# Altium PCB PCB1.PcbDoc
Units mil, origin at the board's own origin, x right, y up, seen from the top; angles counter-clockwise.
Board outline 6000 x 4000 mil, 3 copper layers (Top Layer, Mid-Layer 1, Bottom Layer); 10 components, 18 nets, 85 pads, 10 vias.
Unrouted connection lines stored in the file: 1.
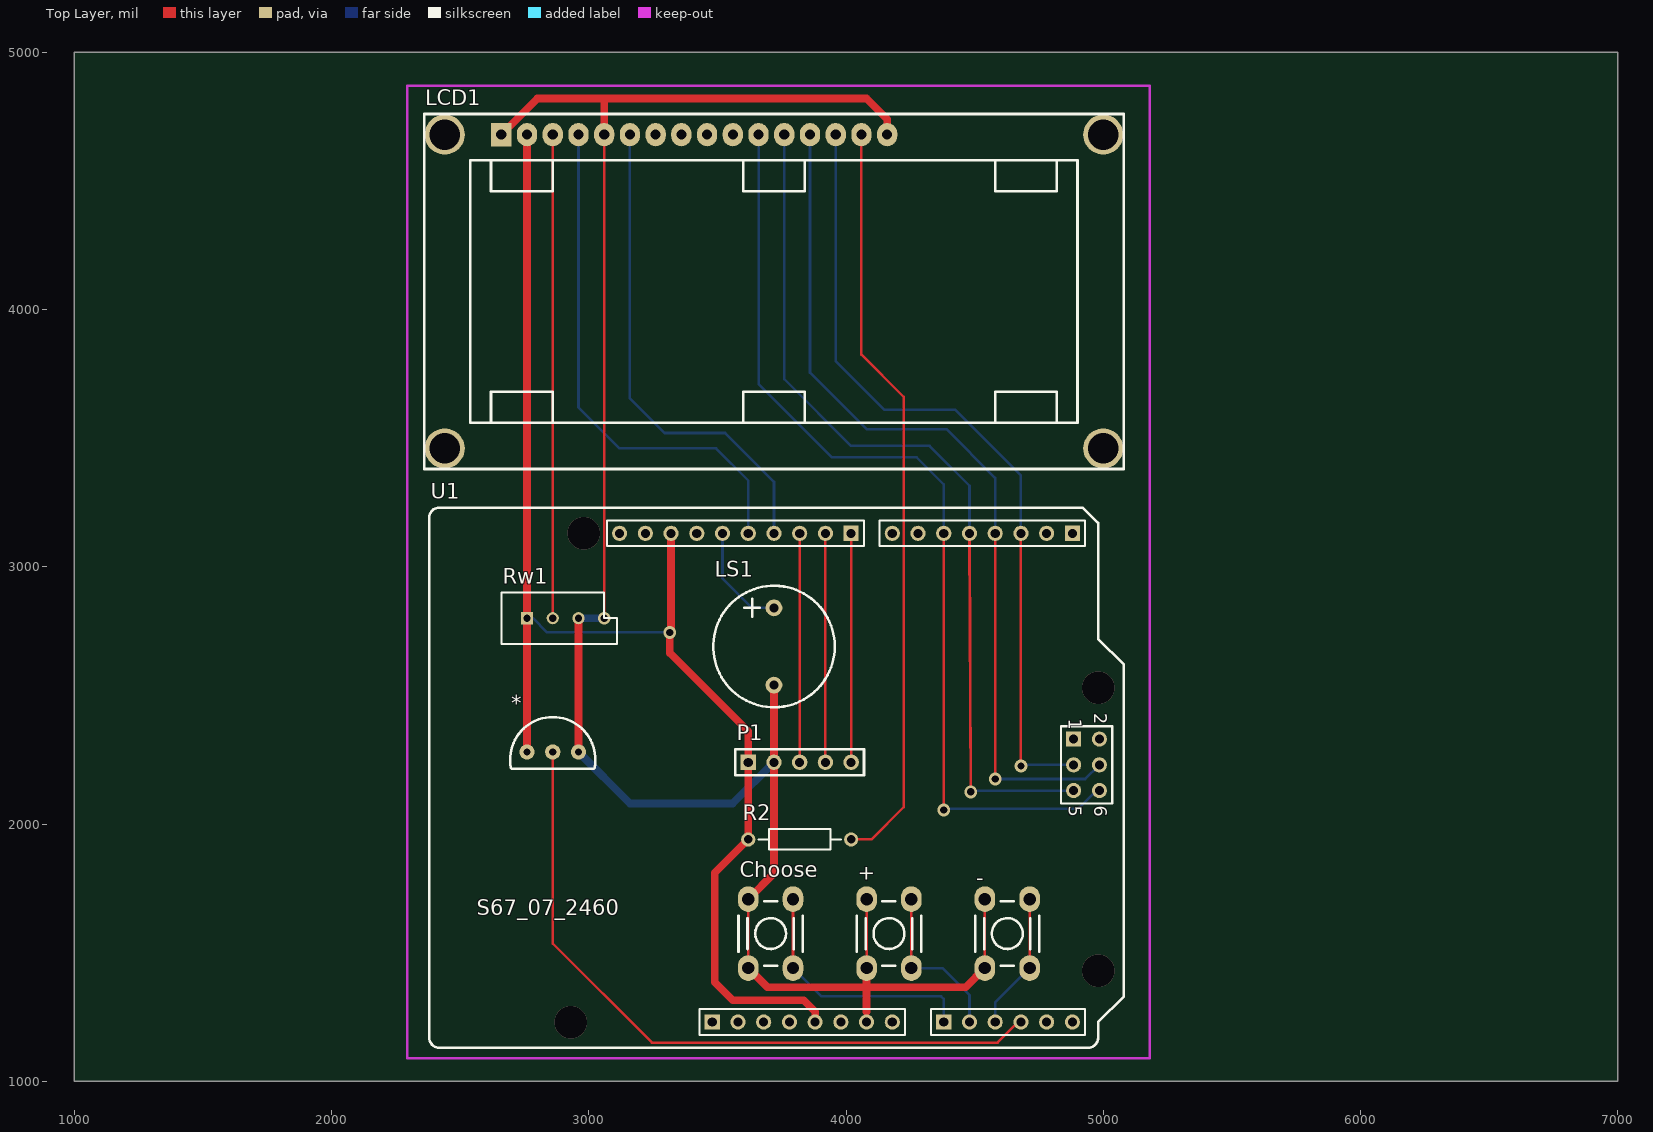
[diagram p0: Top Layer view]
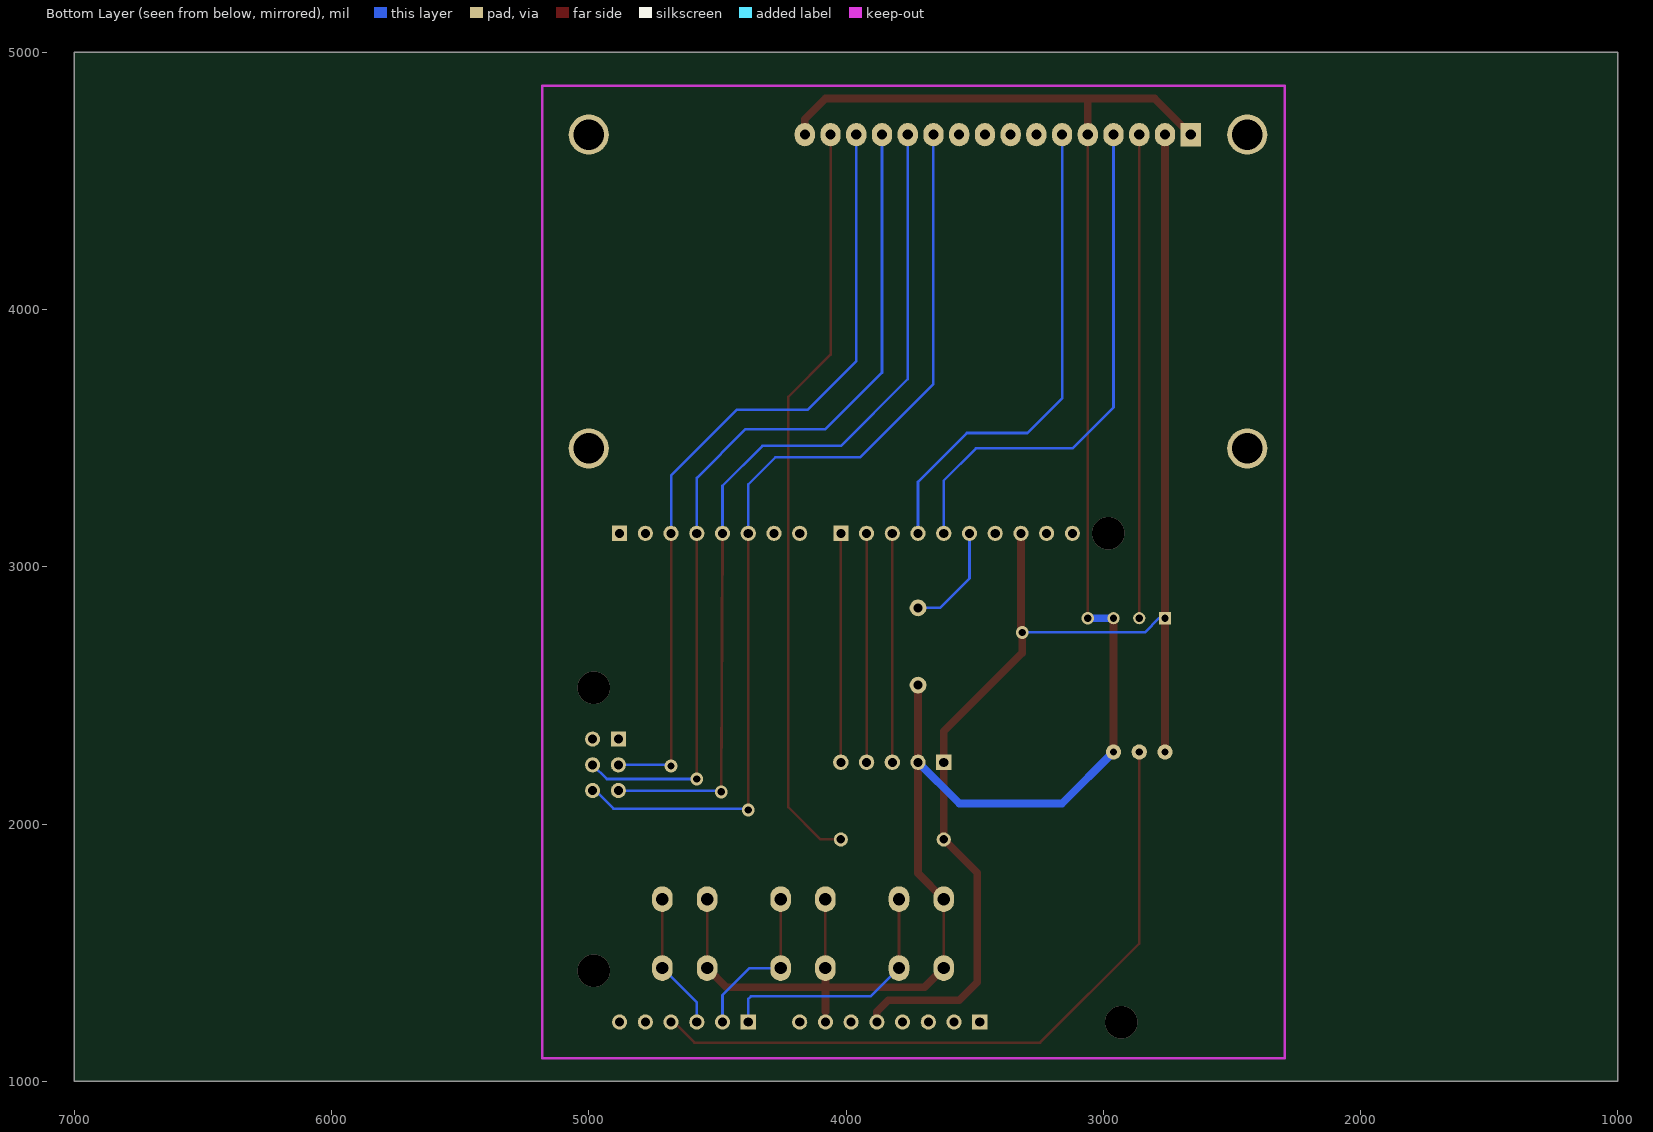
[diagram p1: Bottom Layer view, seen from below]

## Layer stack, top to bottom
Top Layer: signal copper 1.4
Dielectric: dielectric 12.6, FR-4, Dk 4.8
Mid-Layer 1: signal copper 1.4
Dielectric: dielectric 12.6, FR-4, Dk 4.8
Bottom Layer: signal copper 1.4

## Board outline
1000,1000 7000,1000 7000,5000 1000,5000

## Design rules (kind name [scope] priority, off if disabled: settings)
Clearance [All] p1: gap=10
PolygonConnect [All] p1: connectstyle=Relief reliefconductorwidth=10 reliefentries=4 polygonreliefangle="90 Angle"
RoutingVias [All] p1: holewidth=28 width=50 viastyle="Through Hole" minholewidth=28 minwidth=50 maxholewidth=28 maxwidth=50
SilkscreenOverComponentPads [All] p1 off: minsilkscreentomaskgap=10
SolderMaskExpansion [All] p1: expansion=4
TestPointUsage [All] p1: valid=0 allowmultiple=FALSE
Testpoint [All] p1: side=15 testpointundercomponent=TRUE minsize=40 maxsize=100 preferedsize=60 minholesize=0 maxholesize=40 preferedholesize=32 testpointgrid=1 style=1023 order=0123456789
Width [All] p1: maxlimit=30 minlimit=10 preferedwidth=10 midlayer1_maxwidth=10 minimp=50.000000 maximp=50.000000 favimp=50.000000
23 further rules are at their usual default settings.

## Components (designator, comment, footprint, x,y, rotation, side; value= is the part's Value field where it differs from the comment)
* "LM35" LM35 2760,2280 r90 top
+ "SW-PB" AN-S 4080,1440 r90 top
- "SW-PB" AN-S 4540,1440 r90 top
Choose "SW-PB" AN-S 3620,1440 r90 top
LCD1 "LCD1602" LCD1602 2660,4680 r0 top
LS1 "Buzzer" Buzzer 3720,2840 r270 top
P1 "Header 5" SIP-5 3620,2240 r0 top
R2 "Res2" AXIAL-0.4 3820,1940 r0 top
Rw1 "RPot" VR5 2860,2800 r0 top
U1 "Arduino" Arduino-UNO 4020,2180 r0 top

## Footprints (in the part's own frame and the unit in brackets; to place one, negate y for a bottom-side part, rotate by r counter-clockwise, add the part's x,y. Pads: shape width x height; smd on the part's side, far side on the other; paste and mask are expansions set on the pad)
AN-S [mil] "小按钮开关"
  oval 100x80 hole 48: 1(0,0) 1(268,0) 2(0,-174) 2(268,-174)
  silkscreen extent 9,-212 259,38
Arduino-UNO [mm] "Arduino板"
  rect 1.5x1.5 hole 0.9: 1(21.844,24.13) 1(21.971,3.81) 9(0,24.13) 19(-13.716,-24.13) 27(9.144,-24.13)
  round 1.5 hole 0.9: 2(19.304,24.13) 2(24.511,3.81) 3(16.764,24.13) 3(21.971,1.27) 4(14.224,24.13) 4(24.511,1.27) 5(11.684,24.13) 5(21.971,-1.27) 6(9.144,24.13) 6(24.511,-1.27) 7(6.604,24.13) 8(4.064,24.13) 10(-2.54,24.13) 11(-5.08,24.13) 12(-7.62,24.13) 13(-10.16,24.13) 14(-12.7,24.13) 15(-15.24,24.13) 16(-17.78,24.13) 17(-20.32,24.13) 18(-22.86,24.13) 20(-11.176,-24.13) 21(-8.636,-24.13) 22(-6.096,-24.13) 23(-3.556,-24.13) 24(-1.016,-24.13) 25(1.524,-24.13) 26(4.064,-24.13) 28(11.684,-24.13) 29(14.224,-24.13) 30(16.764,-24.13) 31(19.304,-24.13) 32(21.844,-24.13)
  silkscreen extent -41.66,-26.67 26.92,26.67
AXIAL-0.4 [mm] "Resistor; 2 Leads"
  round 1.4 hole 0.85: 1(-5.08,0) 2(5.08,0)
  silkscreen extent -4.06,-1.02 4.06,1.02
Buzzer [mil] "蜂鸣器"
  round 65 hole 36: 1(0,0) 2(300,0)
  silkscreen extent -86,-236 386,236
LCD1602 [mm] "1602液晶屏"
  round 3.962 hole 3: 0(-5.588,-30.988) 0(-5.588,0) 0(59.436,-30.988) 0(59.436,0)
  rect 2x2.3 hole 1: 1(0,0)
  oval 2x2.3 hole 1: 2(2.54,0) 3(5.08,0) 4(7.62,0) 5(10.16,0) 6(12.7,0) 7(15.24,0) 8(17.78,0) 9(20.32,0) 10(22.86,0) 11(25.4,0) 12(27.94,0) 13(30.48,0) 14(33.02,0) 15(35.56,0) 16(38.1,0)
  silkscreen extent -7.62,-33.02 61.47,2.03
LM35 [mil]
  round 60 hole 28: 1(0,0) 2(0,-100) 3(0,-200)
  silkscreen extent -65,-266 136,66
SIP-5 [mil]
  rect 60x60 hole 35: 1(0,0)
  round 60 hole 35: 2(100,0) 3(200,0) 4(300,0) 5(400,0)
  silkscreen extent -50,-50 450,50
VR5 [mm] "Potentiometer; 3 Leads"
  rect 1.2x1.2 hole 0.7: 1(-2.54,0)
  round 1.2 hole 0.7: 2(0,0) 3(2.54,0)
  silkscreen extent -5.08,-2.54 6.35,2.54

## Part data
*: "LM35温度传感器"
+ - Choose: "微动开关"
LCD1: "液晶屏"
LS1: library part Bell, "Electrical Bell"
P1: "Header, 5-Pin"
R2: "Resistor"
Rw1: "Potentiometer"
U1: library part Arduino-UNO

## Via types
v1: diameter 50, hole 28, Top Layer to Bottom Layer, 6 vias
v2: diameter 125.98, hole 125.98, Top Layer to Bottom Layer, 4 vias

## Nets (pads, with @x,y where several pads share a name; then routed paths per layer and width w, separated by ;. In a path a pad name is that pad's centre, name@x,y a point inside that pad or via, vN(x,y) a via of type N, cw(c..) or ccw(c..) an arc to the next point about the centre after c; other vN are vias at no path point)
+5V: *.1 LCD1.2 P1.1 R2.1 Rw1.1 U1.16 U1.23 | length 5385.6
  Top Layer w30: *.1 Rw1.1 LCD1.2 ; v1(3315,2745) 3315,2665 3620,2360 P1.1 R2.1 3490,1810 3490,1385 3560.47,1314.53 3835.47,1314.53 3880,1270 U1.23 ; v1@3320,2740 U1.16
  Bottom Layer w10: Rw1.1 2782.76,2800 2837.76,2745 v1(3315,2745)
GND: *.3 +.1 -.1 Choose.1 LCD1.1 LCD1.5 LCD1.16 LS1.2 P1.2 Rw1.3 U1.24 U1.25 | length 8029.8
  Top Layer w10: v1(3060,2800) LCD1.5 ; Choose.1@3620,1440 Choose.1@3620,1708 ; +.1@4080,1440 +.1@4080,1708 ; -.1@4540,1440 -.1@4540,1708
  Top Layer w30: LCD1.1 2800,4820 4080,4820 4160,4740 LCD1.16 ; *.3 Rw1.3 ; LCD1.5 3060,4820 ; Choose.1@3620,1440 3695,1365 4080,1365 4465,1365 -.1@4540,1440 ; Choose.1@3620,1708 3720,1808 P1.2 LS1.2 ; 4080,1270 +.1@4080,1440
  Bottom Layer w30: *.3 3160,2080 3560,2080 P1.2 ; Rw1.3 v1(3060,2800)
Net*_2: *.2 U1.30 | length 2757.6
  Top Layer w10: *.2 2860,1535 3245,1150 4589.06,1150 4669.06,1230 U1.30
Net+_2: +.2 U1.28 | length 642.5
  Top Layer w10: +.2@4254,1440 +.2@4254,1708
  Bottom Layer w10: +.2@4254,1440 4375,1440 4480,1335 U1.28
Net-_2: -.2 U1.29 | length 533.5
  Top Layer w10: -.2@4714,1440 -.2@4714,1708
  Bottom Layer w10: U1.29 4580,1306 -.2@4714,1440
NetChoose_2: Choose.2 U1.27 | length 993.7
  Top Layer w10: Choose.2@3794,1440 Choose.2@3794,1708
  Bottom Layer w10: Choose.2@3794,1440 3904,1330 4370,1330 4380,1320 U1.27
NetLCD1_3: LCD1.3 Rw1.2 | length 1887.1
  Top Layer w10: Rw1.2 LCD1.3 LCD1.3@2865,4675
NetLCD1_4: LCD1.4 U1.13 | length 2043.1
  Bottom Layer w10: LCD1.4 2960,3620 3120,3460 3495,3460 3620,3335 U1.13
NetLCD1_6: LCD1.6 U1.12 | length 1919.6
  Bottom Layer w10: LCD1.6 3160,3655 3295,3520 3530,3520 3720,3330 U1.12
NetLCD1_11: LCD1.11 U1.6 | length 3752.8
  Top Layer w10: v1(4380,2055) 4380,2125 4380.47,2125.47 U1.6@4380.02,3130
  Bottom Layer w10: LCD1.11 3660,3710 3945,3425 4275,3425 4380,3320 U1.6@4380,3130 ; v1(4380,2055) 4385,2060 4904.06,2060 4974.06,2130 U1.6@4985,2130
NetLCD1_12: LCD1.12 U1.5 | length 3439
  Top Layer w10: U1.5@4480,3135 v1(4485,2125)
  Bottom Layer w10: LCD1.12 3760,3730 4020,3470 4325,3470 4480,3315 U1.5@4480,3130 ; v1(4485,2125) 4490,2130 U1.5@4885,2130
NetLCD1_13: LCD1.13 U1.4 | length 3417.8
  Top Layer w10: v1(4580,2175) 4580,2190 4580.47,2190.47 U1.4@4580,3135
  Bottom Layer w10: LCD1.13 3860,3755 4080,3535 4390,3535 4580,3345 U1.4@4580,3130 ; v1(4580,2175) 4930,2175 U1.4@4985,2230
NetLCD1_14: LCD1.14 U1.3 | length 3126.4
  Top Layer w10: v1(4680,2225) U1.3@4680,3135
  Bottom Layer w10: LCD1.14 3960,3800 4150,3610 4425,3610 4680,3355 U1.3@4680,3130 ; v1(4680,2225) 4685,2230 U1.3@4885,2230
NetLCD1_15: LCD1.15 R2.2 | length 2946.2
  Top Layer w10: R2.2 4099.06,1940 4224.53,2065.47 4224.53,3660.47 4060,3825 LCD1.15 LCD1.15@4065,4675
NetLS1_1: LS1.1 U1.14 | length 422.6
  Bottom Layer w10: U1.14 3520,2955 3635,2840 LS1.1
NetP1_3: P1.3 U1.11 | length 895
  Top Layer w10: P1.3 U1.11@3820,3135
NetP1_4: P1.4 U1.10 | length 895
  Top Layer w10: P1.4 U1.10@3920,3135
NetP1_5: P1.5 U1.9 | length 890
  Top Layer w10: P1.5 U1.9
pads on no net: LCD1.0 LCD1.7 LCD1.8 LCD1.9 LCD1.10 U1.1 U1.2 U1.7 U1.8 U1.15 U1.17 U1.18 U1.19 U1.20 U1.21 U1.22 U1.26 U1.31 U1.32
copper on no net:
  other v2: 2930,1230 4980,1430 4980,2530 2980,3130

## Keep-outs
Keep-Out Layer:
  lines w10: 2295,1090 5180,1090 5180,4870 2295,4870 2295,1090

## Silkscreen, mask and mechanical layers (free items; w line width, h text height)
Top Overlay:
  text "S67_07_2460" at 2565,1645 h60

## Text inside footprints (layer, text, board x,y; h text height)
U1: Top Overlay "6" at 4965,2070 h50 r270; Top Overlay "5" at 4865,2070 h50 r270; Top Overlay "2" at 4965,2430 h50 r270; Top Overlay "1" at 4865,2410 h50 r270